# Altium PCB V3.2_Board.PcbDoc (part 7 of 9)
Units mil, origin at the board's own origin, x right, y up, seen from the top; angles counter-clockwise.
Board outline 7795.28 x 4881.89 mil, 2 copper layers (Top Layer, Bottom Layer), stack 57 mil thick; 419 components, 273 nets, 1244 pads, 414 vias.
Unrouted connection lines stored in the file: 3.
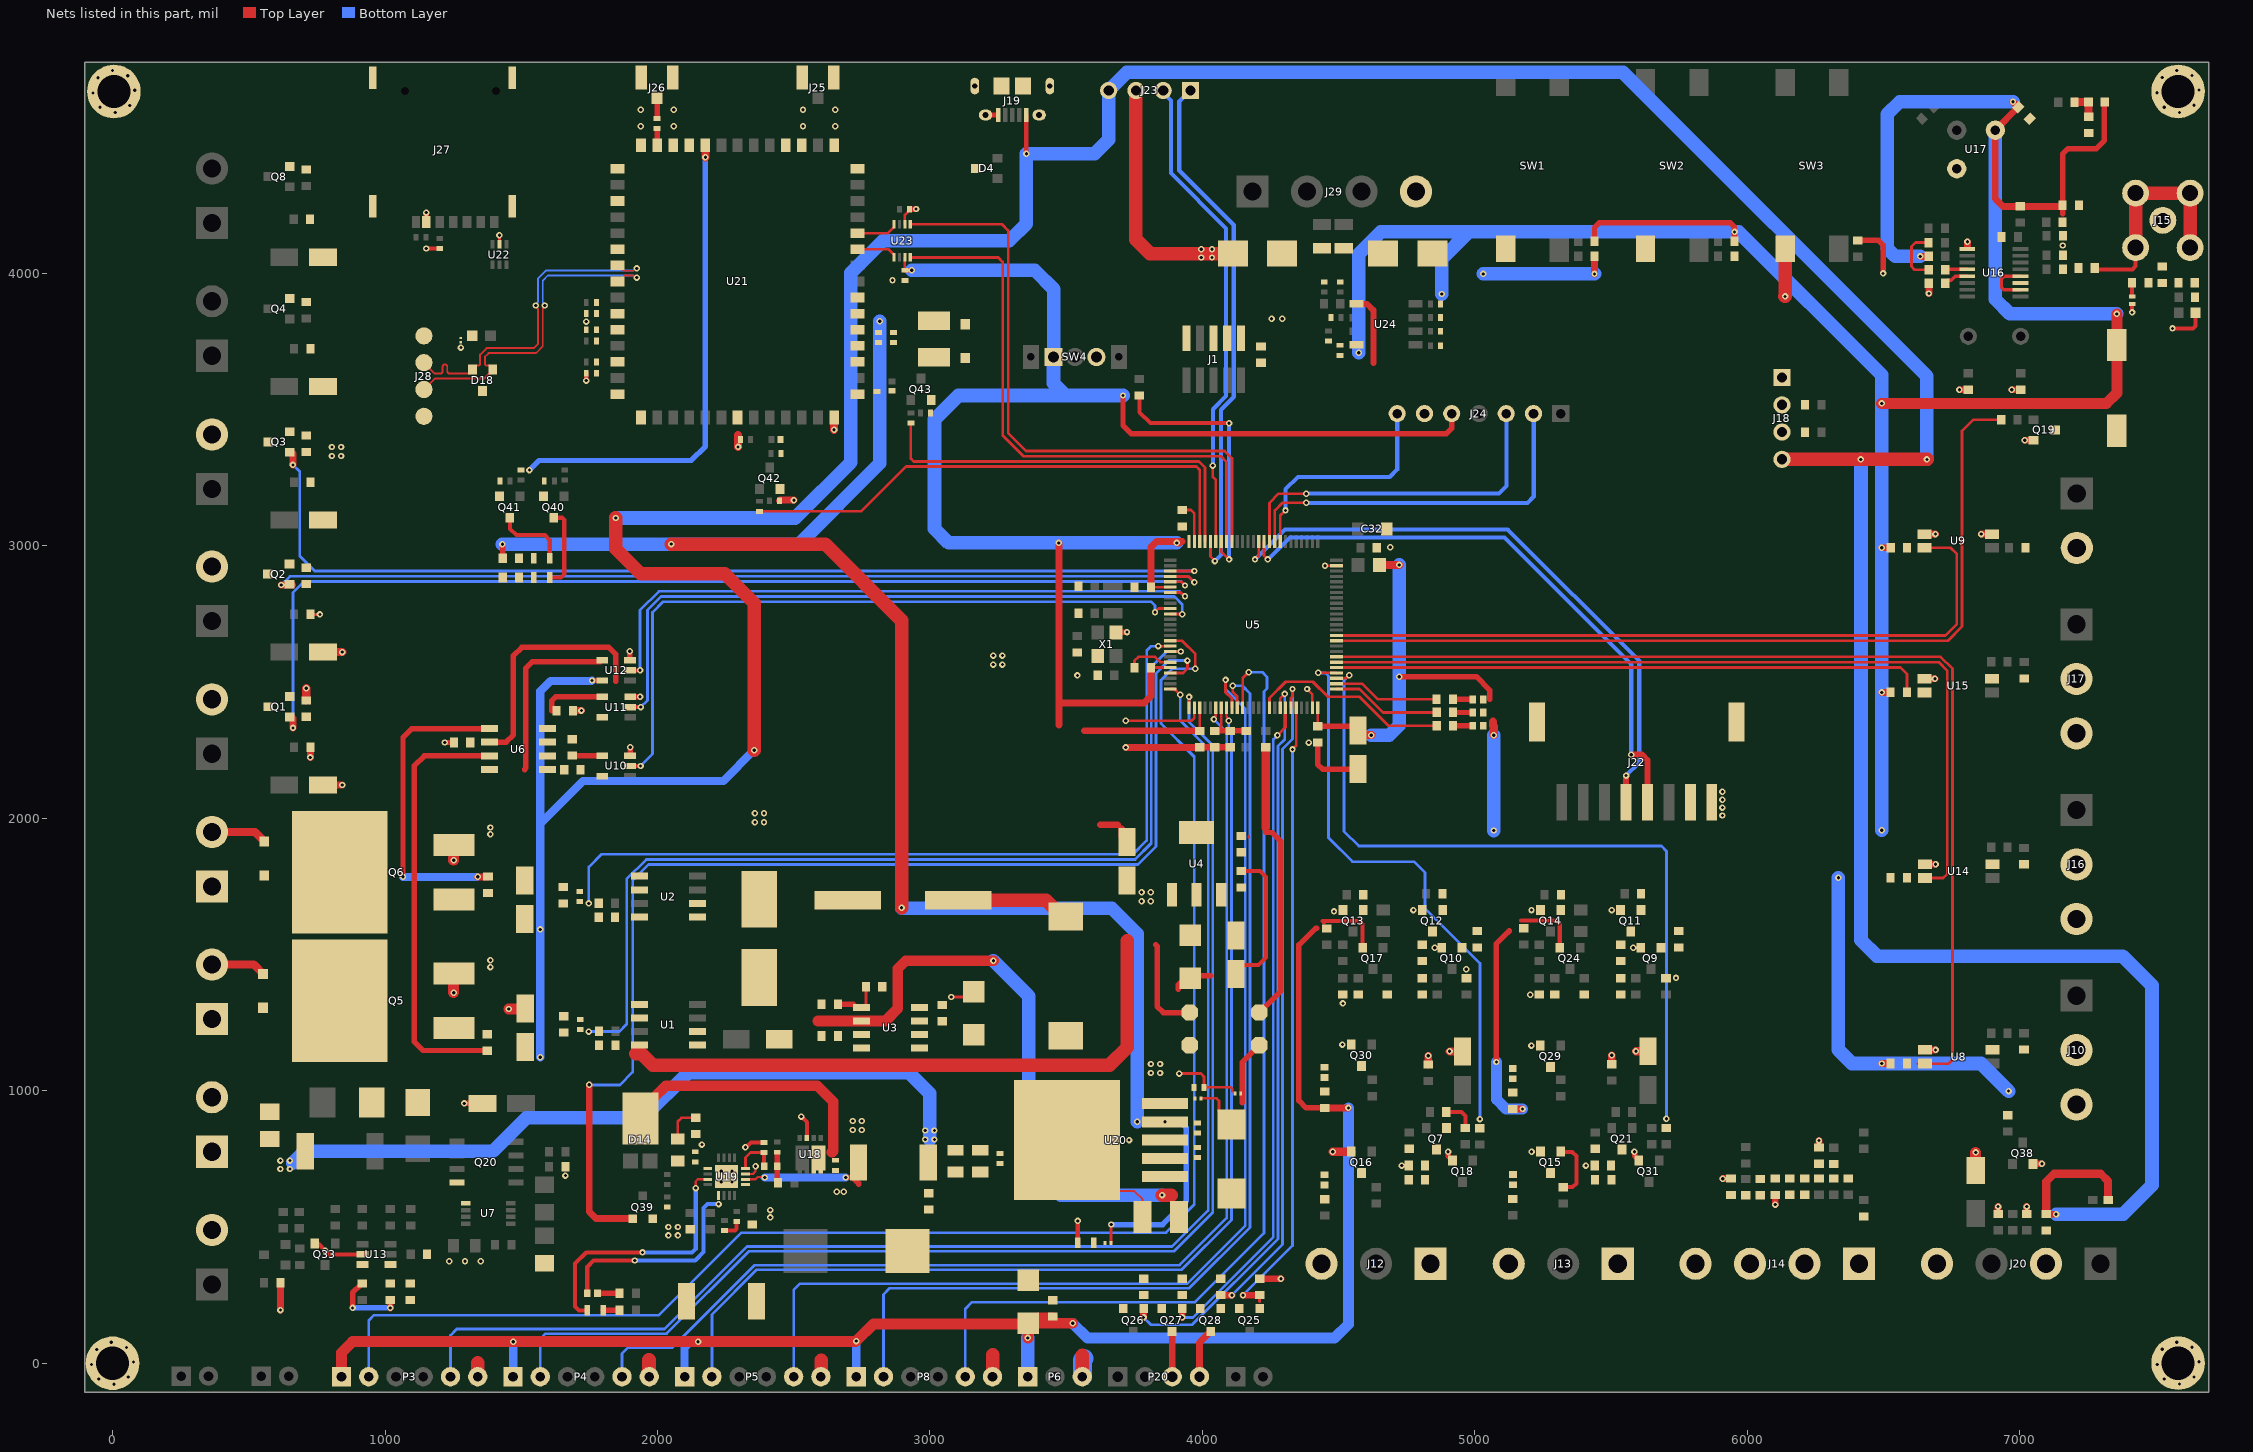
[diagram p3: the nets of this part, all layers, seen from the top]

## Via types
v1: diameter 23.62, hole 11.81, Top Layer to Bottom Layer, 414 vias

## Nets (pads, with @x,y where several pads share a name; then routed paths per layer and width w, separated by ;. In a path a pad name is that pad's centre, name@x,y a point inside that pad or via, vN(x,y) a via of type N, cw(c..) or ccw(c..) an arc to the next point about the centre after c; other vN are vias at no path point) (continued)
NetC54_1: (continued)
  Top Layer w12: C54.1@6726,4012.67 6727.83,4014.5 U16.12@6807.56,4014.5
NetC70_1: C70.1 U16.13 | length 94
  Top Layer w12: C70.1@6726,3963 6726,3965.5 6735,3974.5 6748.26,3974.5 6763.26,3989.5 U16.13@6807.56,3989.5
NetC77_2: C77.2 SB16.1
NetC79_2: C79.2 R114.1 R115.2
NetC80_1: C80.1 D15.1 U19.12 | length 167.2
  Top Layer w10: U19.12@2322.67,714.32 2322.67,754.72 2341.45,773.5 C80.1@2391,773.5 C80.1@2391.63,772.87 ; D15.1@2391.63,723.95 D15.1@2392.26,723.32
  Top Layer w15: D15.1@2391.63,723.95 C80.1@2391.63,772.87
NetC81_2: C81.2 R119.2 U19.1
NetC82_1: C82.1 D15.2 R121.2 | length 104.1
  Top Layer w20: R121.2@2439.88,765.14 2439.69,764.95 2439.69,723.51 D15.2@2439.5,723.32 2439.5,666.02 C82.1@2442.88,662.64
NetC87_1: C87.1 L5.2 R120.2 U19.10 | length 499
  Top Layer w8: U19.10@2322.67,674.95 2360,674.95 2368.2,683.16 2392.32,683.16 v1(2393.95,681.52)
  Top Layer w10: R120.2@2711.43,680.08 2737.93,706.57 R120.2@2737.93,736.64
  Top Layer w20: v1(2691.03,681.52) 2716.43,681.52 2737.93,660.03 2737.93,656.78
  Bottom Layer w30: v1(2393.95,681.52) v1(2691.03,681.52)
NetC92_1: C92.1 U21.55 | length 59.4
  Top Layer w20: U21.55@1998.65,4470.13 C92.1@1998.65,4529.54
NetC96_2: C96.2 R134.2 U21.10
NetC97_2: C97.2 R135.2 U21.11
NetC98_2: C98.2 R136.2 U21.13
NetD1_1: D1.1 L2.1 U3.2
NetD5_2: D5.2 F2.1 R63.2
NetD6_2: D6.2 D7.2
NetD8_2: D8.2 F3.1 R87.2
NetD17_2: D17.2 F1.2 J28.1
NetJ14_1: J14.1 SB5.2
NetJ14_2: J14.2 SB35.2 SB36.2
NetJ15_1: J15.1 SB4.2
NetJ18_2: J18.2 SB19.2
NetJ18_3: J18.3 SB20.2
NetJ20_2: J20.2 R21.1
NetLED1_2: LED1.2 R14.2 | length 73.7
  Top Layer w12: R14.2@4919.49,2437 R14.2@4919.93,2436.56 ; LED1.2@4992.36,2436.56 LED1.2@4992.8,2436.13
  Top Layer w20: R14.2@4919.93,2436.56 LED1.2@4992.36,2436.56
NetLED2_2: LED2.2 R15.2 | length 72.9
  Top Layer w12: R15.2@4919.99,2388.23 R15.2@4920.08,2388.15 ; LED2.2@4992.71,2388.15 LED2.2@4992.8,2388.06
  Top Layer w20: R15.2@4920.08,2388.15 LED2.2@4992.71,2388.15
NetLED3_2: LED3.2 R17.2 | length 73
  Top Layer w10: R17.2@4919.99,2339.47 R17.2@4920.52,2340
  Top Layer w20: R17.2@4920.52,2340 LED3.2@4992.8,2340
NetLED4_1: LED4.1 R50.1
NetLED5_1: LED5.1 R51.1
NetLED6_1: LED6.1 R93.1
NetLED7_1: LED7.1 R94.1
NetLED8_2: LED8.2 R53.2 SB3.1 | length 96.3
  Top Layer w30: SB3.1@7205,4630 7206.64,4628.36 LED8.2@7252.58,4628.36 ; R53.2@7252.52,4574.5 LED8.2@7252.52,4622.52
NetLED9_1: LED9.1 R126.1 | length 59.5
  Top Layer w20: LED9.1@1801.53,194 R126.1@1861,194
NetLED9_2: LED9.2 U19.3 | length 968.1
  Top Layer w8: v1(2140.38,642.67) 2140.38,667.29 2148.05,674.95 U19.3@2184.88,674.95
  Top Layer w15: LED9.2@1742.47,194 1712,194 1698,208 1698,366 1738.63,406.63 v1(1945.03,406.63)
  Bottom Layer w15: v1(1945.03,406.63) 2127.26,406.63 2140.38,419.76 v1(2140.38,642.67)
NetLED10_1: LED10.1 R128.1 | length 81.3
  Top Layer w20: LED10.1@1779.7,257 R128.1@1861,257
NetLED10_2: LED10.2 U19.5 | length 769
  Top Layer w7: v1(2224.11,584.02) v1@2224.18,584.09 ; U19.5@2224.18,615.83 U19.5@2224.25,615.9
  Top Layer w15: LED10.2@1742.3,257 1742.3,353.66 1765.55,376.91 v1(1916.82,376.91)
  Bottom Layer w15: v1(1916.82,376.91) 1917.23,377.32 2138.58,377.32 2168.81,407.54 2168.81,569.59 2183.24,584.02 v1(2224.11,584.02)
NetLED11_1: LED11.1 R132.1
NetLED12_1: LED12.1 R137.2
NetLED12_2: LED12.2 Q40.3 | length 299.4
  Top Layer w15: LED12.2@1604.53,2883.57 1645.57,2883.57 1658,2896 1658,3094.2 1649.21,3102.99 Q40.3@1619.11,3102.99
NetLED13_1: LED13.1 R140.2
NetLED13_2: LED13.2 Q41.3 | length 270.9
  Top Layer w15: Q41.3@1458.11,3102.99 1459.35,3101.75 1459.35,3062.13 1482.48,3039 1587,3039 1604.53,3021.47 LED13.2@1604.53,2954
NETLIGHT: R141.1 U21.52 | length 1786.9
  Top Layer w30: v1(2175.81,4426.25) U21.52@2175.81,4470.13
  Bottom Layer w20: v1(1530,3277.86) 1565.14,3313 2123.52,3313 2175.81,3365.29 v1(2175.81,4426.25)
NetLS1_2: LS1.2 Q19.3
NetQ5_1: Q5.1 R24.1
NetQ6_1: Q6.1 R25.1
NetQ7_1: Q7.1 R27.1 R29.1 | length 120.8
  Top Layer w15: R27.1@4894.77,922 4951,922 4965,908 R29.1@4965,863.27
NetQ9_1: Q9.1 R42.1
NetQ10_1: Q10.1 R44.1
NetQ11_1: Q11.1 R46.1
NetQ11_3: Q11.3 R42.2 R43.1
NetQ12_1: Q12.1 R47.1
NetQ12_3: Q12.3 R44.2 R45.1
NetQ13_1: Q13.1 R52.1
NetQ14_1: Q14.1 R56.1
NetQ15_1: Q15.1 R89.2 | length 224.2
  Top Layer w15: Q15.1@5308.4,775.59 5357.24,775.59 5372.41,760.41 5372.41,659.58 5358.83,646 R89.2@5325,646